# Altium PCB TYH-PD67W 2C1A 协议板.pcbdoc
Units mm, origin at the board's own origin, x right, y up, seen from the top; angles counter-clockwise.
Board outline 94.32 x 66.89 mm, 5 copper layers (Top Layer, Signal Layer 3, Signal Layer 1, Signal Layer 2, Bottom Layer), stack 0.941 mm thick; 46 components, 153 nets, 245 pads, 157 vias.
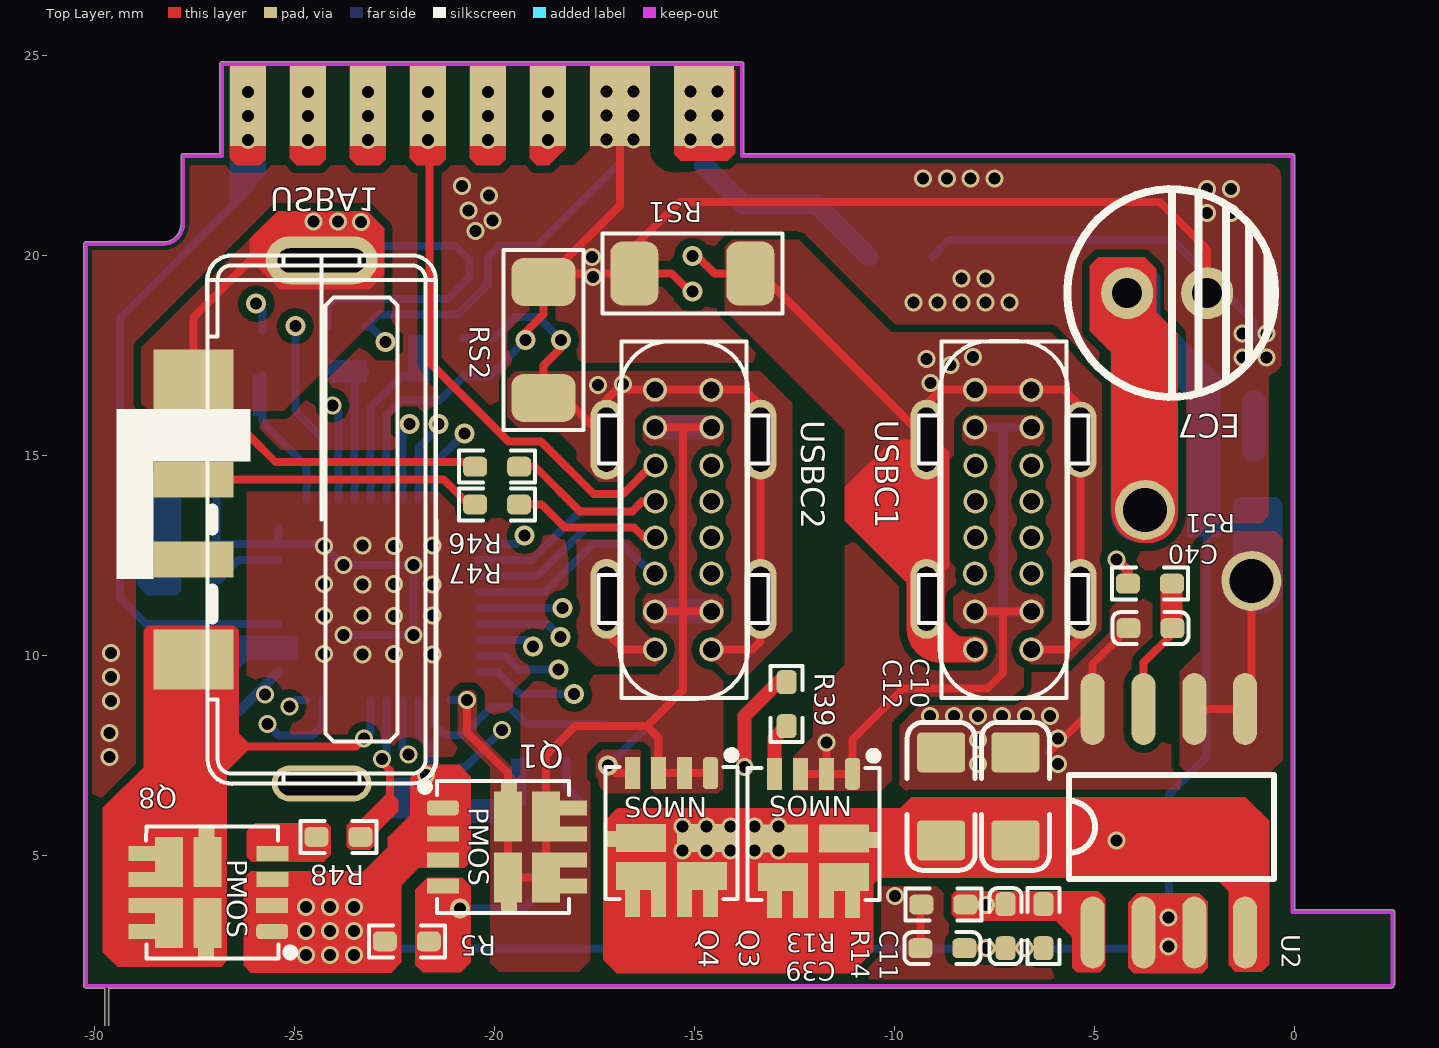
[diagram p0: Top Layer view]
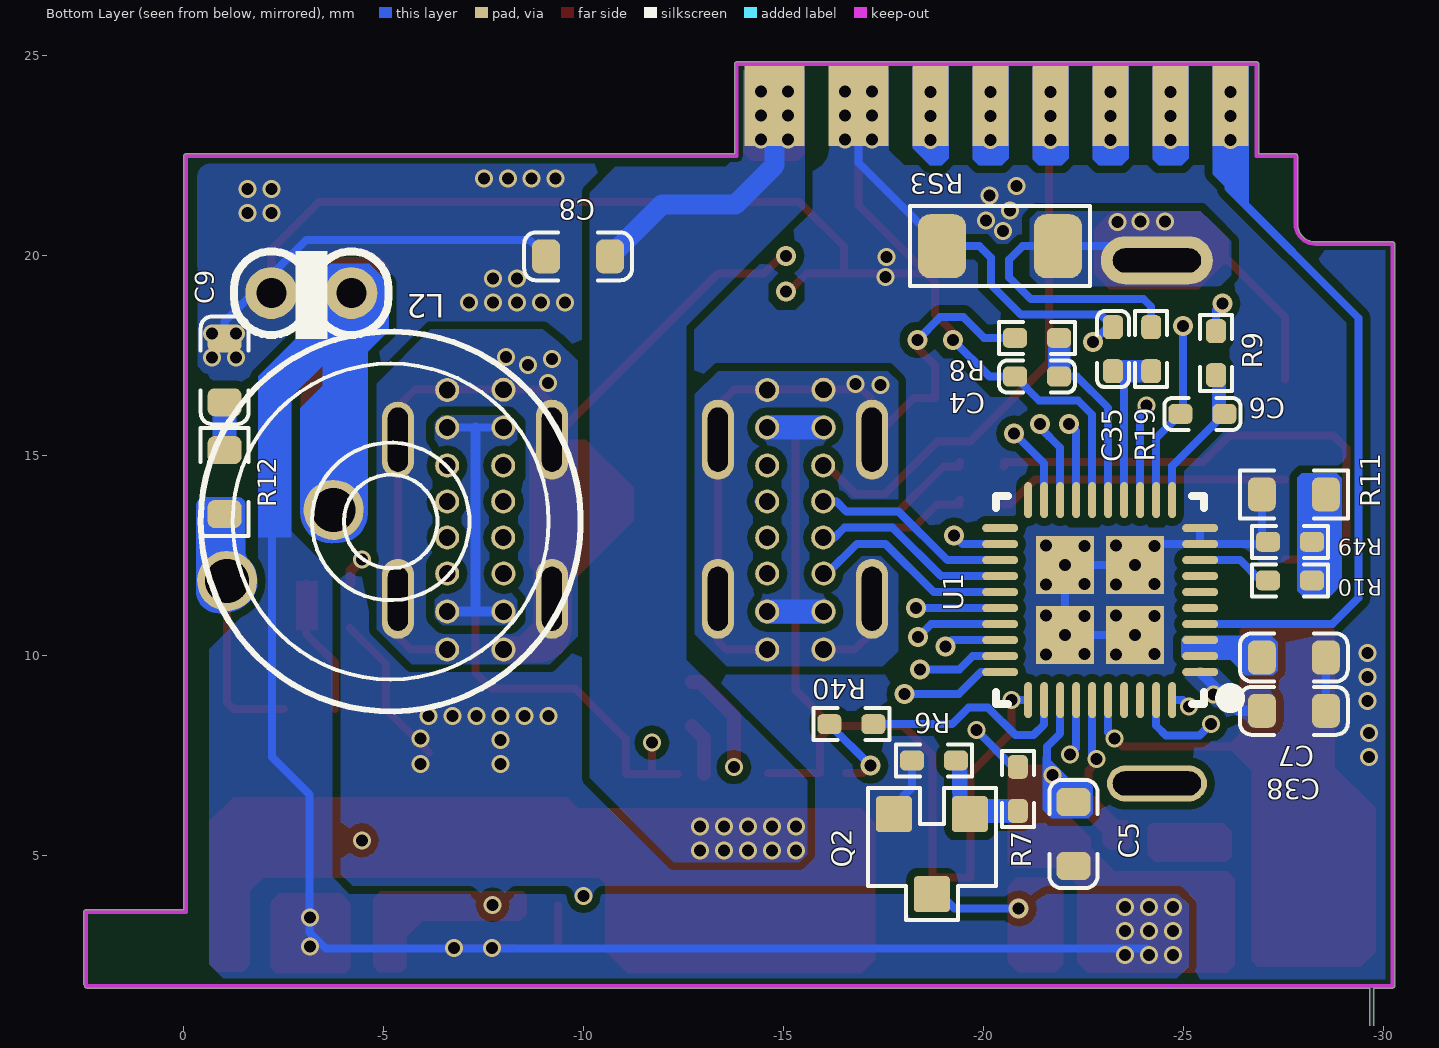
[diagram p1: Bottom Layer view, seen from below]
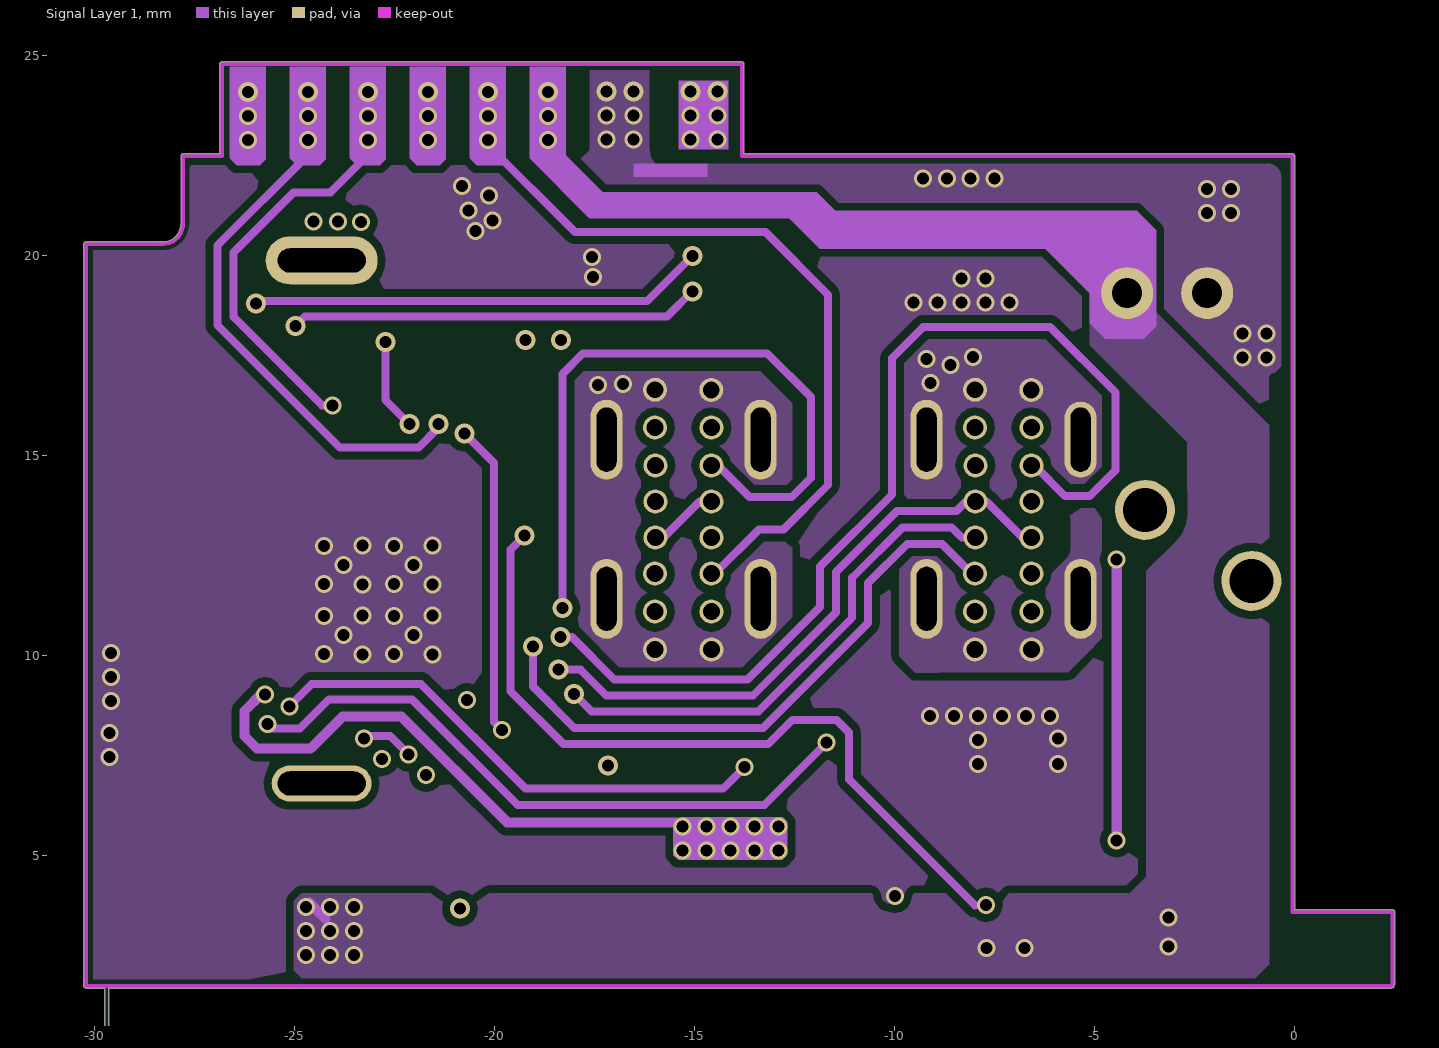
[diagram p2: Signal Layer 1]
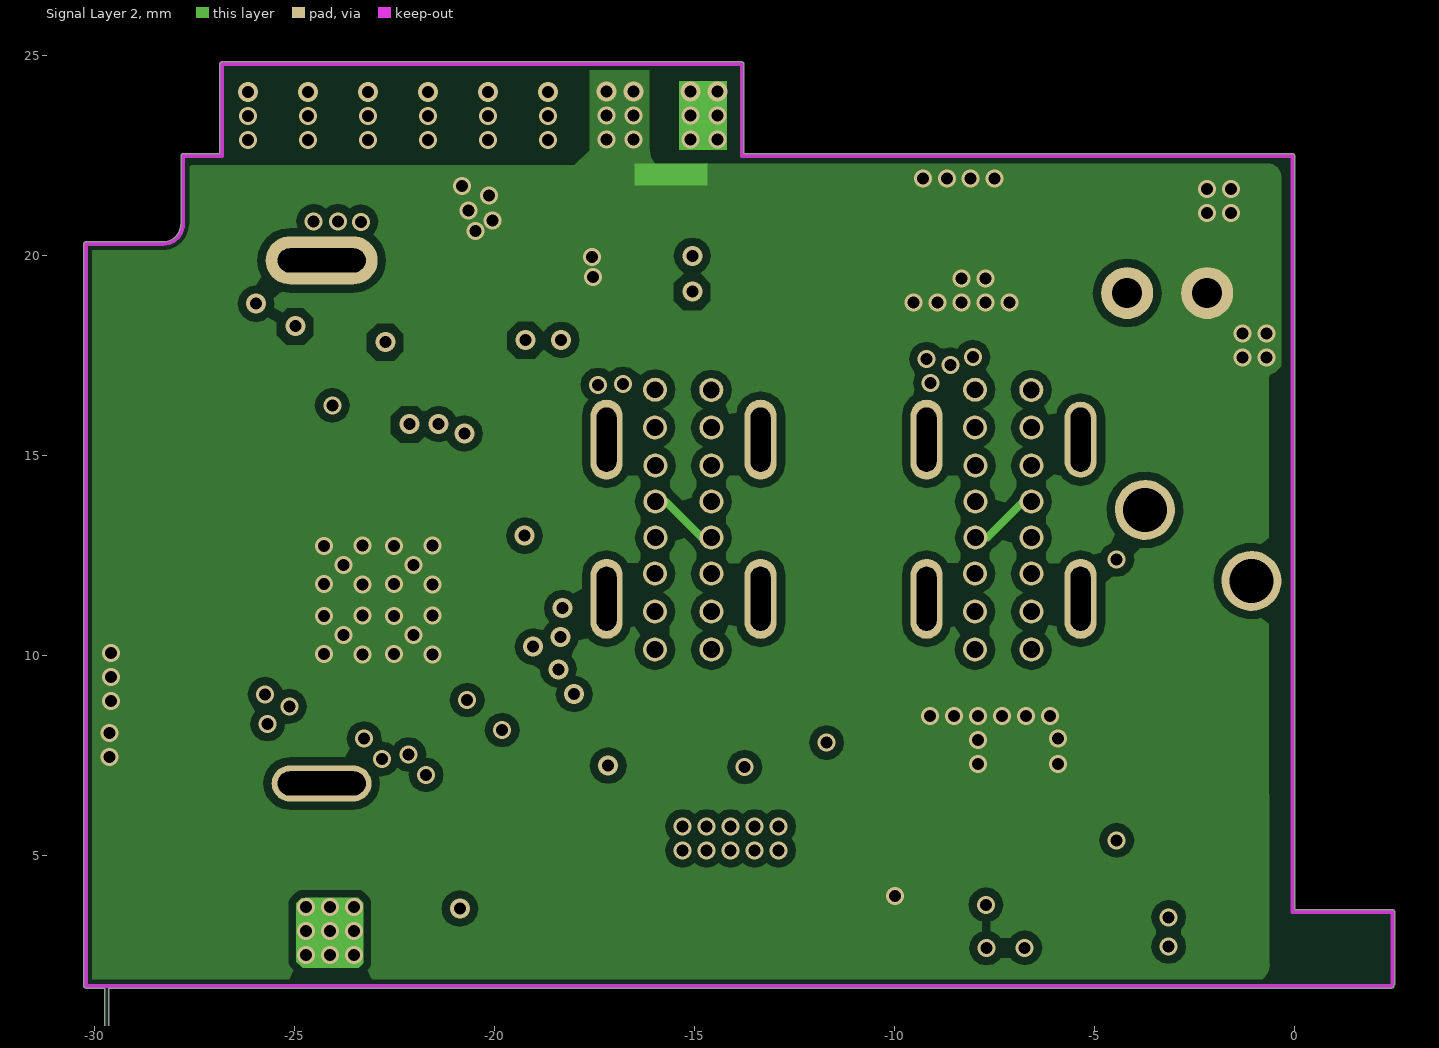
[diagram p3: Signal Layer 2]

## Layer stack, top to bottom
Top Solder: solder mask 0.0102, Solder Resist, Dk 3.5
Top Layer: signal copper 0.0356
Dielectric 1: core 0.254, FR-4, Dk 4.2
Signal Layer 3: signal copper 0.036
Dielectric 4: prepreg 0.127, Dk 4.2
Signal Layer 1: signal copper 0.036
Dielectric 2: core 0.254, Dk 4.2
Signal Layer 2: signal copper 0.036
Dielectric 3: prepreg 0.127, Dk 4.2
Bottom Layer: signal copper 0.0356
Bottom Solder: solder mask 0.0102, Solder Resist, Dk 3.5

## Board outline
-60.945,-41.225 -45.944,-41.225 ccw(c-45.944,-41.2) -45.919,-41.2 -45.919,-38.225 -43.445,-38.225 ccw(c-43.445,-38.2) -43.419,-38.2 -43.419,-37 ccw(c-43.445,-37) -43.445,-36.975 -45.919,-36.975 -45.919,-35.625 -43.445,-35.625 ccw(c-43.445,-35.6) -43.419,-35.6 -43.419,-34.4 ccw(c-43.445,-34.4) -43.445,-34.375 -45.919,-34.375 -45.919,-32.925 -43.445,-32.925 ccw(c-43.445,-32.9) -43.419,-32.9 -43.419,-27.85 -39.751,-27.85 -39.759,-40.693 ccw(c-39.709,-40.7) -39.709,-40.75 -29.759,-40.752 -29.76,-42.002 ccw(c-29.71,-42.002) -29.71,-42.052 0,-42.052 ccw(c0,-42.002) 0.05,-42.002 0.05,-37.55 2.5,-37.55 ccw(c2.5,-37.5) 2.55,-37.5 2.55,-32.55 5.163,-32.55 5.16,-37.409 ccw(c5.21,-37.409) 5.16,-37.409 ccw(c8.207,-37.409) 8.207,-40.456 ccw(c8.207,-40.406) 8.207,-40.456 ccw(c8.207,-40.406) 8.207,-40.456 25.296,-40.456 ccw(c25.296,-40.406) 25.308,-40.455 ccw(c25.296,-37.407) 28.344,-37.407 28.352,-4.393 ccw(c28.302,-4.393) 28.352,-4.393 ccw(c28.302,-4.393) 28.351,-4.381 ccw(c25.304,-4.393) 25.304,-1.346 8.229,-1.346 ccw(c8.229,-4.393) 5.181,-4.375 ccw(c5.228,-4.393) 5.178,-4.393 5.175,-9.653 ccw(c5.225,-9.653) 5.225,-9.703 6.674,-9.704 6.673,-10.703 5.225,-10.702 ccw(c5.225,-10.753) 5.174,-10.753 5.163,-32.45 0.05,-32.45 0.05,-9.32 2.5,-9.32 ccw(c2.5,-9.269) 2.55,-9.269 2.55,-2.769 ccw(c2.5,-2.769) 2.5,-2.719 0.05,-2.719 0.05,0 ccw(c0,0) 0,0.05 -29.65,0.05 -29.65,1.682 2.433,1.682 ccw(c2.433,1.733) 2.483,1.733 ccw(c2.433,1.733) 2.482,1.745 ccw(c2.45,1.784) 2.5,1.784 2.5,3.584 ccw(c2.45,3.584) 2.45,3.635 0,3.635 0,22.484 ccw(c-0.05,22.484) -0.014,22.52 ccw(c-0.05,22.484) -0.05,22.535 -13.768,22.535 -13.768,24.784 ccw(c-13.819,24.784) -13.819,24.835 -26.819,24.835 ccw(c-26.819,24.784) -26.869,24.784 -26.869,22.535 -27.789,22.535 ccw(c-27.789,22.484) -27.84,22.483 -27.84,20.784 cw(c-28.289,20.784) -28.289,20.335 cw(c-28.289,20.784) -28.289,20.335 cw(c-28.289,20.284) -28.289,20.335 -30.217,20.335 ccw(c-30.217,20.284) -30.268,20.284 -30.268,1.733 ccw(c-30.217,1.733) -30.217,1.682 -29.75,1.682 -29.75,-1.25 -31.7,-1.25 ccw(c-31.7,-1.3) -31.75,-1.3 -31.75,-26.75 -39.7,-26.75 ccw(c-39.7,-26.8) -39.75,-26.8 -39.751,-27.75 -43.445,-27.75 ccw(c-43.445,-27.8) -43.488,-27.775 -45.919,-27.775 -45.919,-24.3 ccw(c-45.945,-24.3) -45.945,-24.275 -65.945,-24.275 ccw(c-65.945,-24.3) -65.97,-24.3 -65.97,-36.2 ccw(c-60.945,-36.2)

## Design rules (kind name [scope] priority, off if disabled: settings)
Clearance Clearance_19 [InNet('NetC4_2') vs InNet('PGND')] p1: gap=0.4
Clearance Clearance_18 [InNet('NetR15_1') vs InNet('PGND')] p2: gap=1
Clearance Clearance_17 [InNet('NetN_1') vs InNet('NetBD1_1')] p3: gap=1.55
Clearance Clearance_16 [InNet('NetN_1') vs InNet('PGND')] p4: gap=1.5
Clearance Clearance_15 [InNet('VIN') vs InNet('PGND')] p5 off: gap=5.8
Clearance Clearance_14 [InNet('CS') vs InNet('Bais-L')] p6: gap=0.45
Clearance Clearance_13 [InNet('SW') vs InNet('CS')] p7: gap=1.5
Clearance Clearance_12 [InNet('NetR15_1') vs InNet('CS')] p8: gap=1
Clearance Clearance_11 [InNet('NetBD1_3') vs InNet('CS')] p9: gap=1.1
Clearance Clearance_10 [InNet('HV') vs InNet('CS')] p10: gap=1.1
Clearance Clearance_9 [InNet('NetL2_1') vs InNet('CS')] p11: gap=1.5
Clearance Clearance_8 [InNet('NetC1_2') vs InNet('PGND')] p12: gap=1.2
Clearance Clearance_7 [InNet('NetBD1_3') vs InNet('PGND')] p13: gap=1.2
Clearance Clearance_6 [InNet('NetC2_2') vs InNet('PGND')] p14: gap=1.3
Clearance Clearance_5 [InNet('Bais-L') vs InNet('PGND')] p15: gap=0.45
Clearance Clearance_4 [InNet('SW') vs InNet('PGND')] p16: gap=1.5
Clearance Clearance_3 [InNet('HV') vs InNet('PGND')] p17: gap=1.2
Clearance Clearance_2 [InNet('NetL2_1') vs InNet('PGND')] p18: gap=1.5
Clearance Clearance_1 [OnLayer('Keep-Out Layer')] p19: gap=0.1
Clearance [All] p20: gap=0.2
PlaneConnect [All] p1: planeconnectstyle=Direct reliefexpansion=0.508 reliefentries=4 reliefconductorwidth=0.3 reliefairgap=0.254
PolygonConnect [All] p1: connectstyle=Direct reliefconductorwidth=0.3 reliefentries=4 polygonreliefangle="90 Angle" airgapwidth=0.3
RoutingVias [All] p1: holewidth=0.711 width=1.27 viastyle="Through Hole" minholewidth=0.711 minwidth=1.27 maxholewidth=0.711 maxwidth=1.27
SolderMaskExpansion [All] p1: expansion=0.05
Width [All] p1: maxlimit=10 minlimit=0.1 preferedwidth=0.2
28 further rules are at their usual default settings.

## Components (designator, comment, footprint, x,y, rotation, side; value= is the part's Value field where it differs from the comment)
C4 "0.1uF" 0402C -22.279,16.568 r0 bottom
C5 "1uF" 0603CX -22.239,4.733 r90 bottom
C6 "0.1uF" 0402C -26.411,15.635 r0 bottom
C7 "1uF" 0603CX -26.947,9.945 r180 bottom
C8 "1uF" 0603CX -10.655,19.974 r0 bottom
C9 "100nF/50V/0603" 0603CX -1.018,17.925 r270 bottom
C10 "2.2nF/250V/0805" 0805C -6.977,6.474 r90 top
C11 "33nF/25V/0402" 0402C -6.826,4.177 r270 top (schematic designator C21)
C12 "100nF/50V/0603" 0805C -8.835,6.474 r90 top (schematic designator C9)
C35 "0.1uF" 0402C -22.826,16.704 r90 bottom
C38 "1uF" 0603CX -28.548,8.613 r0 bottom
C39 "33nF/25V/0402" 0402C -7.856,2.277 r180 top (schematic designator C21)
C40 "33nF/25V/0402" 0402C -4.555,11.078 r0 top (schematic designator C21)
EC7 "560uF/25V/6.3*16" EG-5*9L -4.184,19.056 r90 top (schematic designator EC6)
L2 "Comment" L-T31125W -5.169,13.346 r340 bottom
Q1 "PPM8PN03R10" DFN3*3 -18.718,5.974 r270 top
Q2 "2N7002KL SOT-23" SOT-23_R -18.699,5.028 r0 bottom (schematic designator Q8)
Q3 "PNM8PN30V50A" DFN3*3 -11.263,4.463 r180 top
Q4 "PNM8PN30V50A" DFN3*3 -14.814,4.479 r180 top
Q8 "PPM8PN03R10" DFN3*3 -28.135,3.309 r90 top
R5 "10K" 0402R#1 -22.746,2.848 r0 top (schematic designator R4)
R6 "10K" 0402R#1 -19.304,7.372 r0 bottom (schematic designator R4)
R7 "2K" 0402R#1 -20.847,7.21 r270 bottom (schematic designator R4)
R8 "100R" 0402R#1 -21.879,17.935 r0 bottom (schematic designator R4)
R9 "100R" 0402r -25.803,17.554 r270 bottom (schematic designator R4)
R10 "10K" 0402R#2 -27.654,11.872 r0 bottom (schematic designator R4)
R11 "100K" 0603Rx -26.947,14.024 r180 bottom (schematic designator R4)
R12 "10R/1206" 0603RX -1.018,15.132 r270 bottom (schematic designator R6)
R13 "1K/0402" 0402R#1 -8.231,3.767 r180 top (schematic designator R22)
R14 "1K/0402" 0402R#1 -6.281,2.677 r90 top (schematic designator R22)
R19 "100R" 0402R#1 -24.182,18.204 r270 bottom (schematic designator R4)
R39 "100R" 0402R#1 -12.698,8.229 r90 top (schematic designator R4)
R40 "100R" 0402R#1 -17.236,8.278 r0 bottom (schematic designator R4)
R46 "100R" 0402R#1 -19.386,14.714 r180 top (schematic designator R4)
R47 "100R" 0402R#1 -19.386,13.77 r180 top (schematic designator R4)
R48 "100R" 0402R#1 -24.454,5.462 r0 top (schematic designator R4)
R49 "10K" 0402R#2 -27.654,12.839 r0 bottom (schematic designator R4)
R51 "1K/0402" 0402R#1 -3.067,11.792 r180 top (schematic designator R22)
RS1 "5mR/1206/1%" 1206RA -17.257,20.543 r0 top (schematic designator RS2)
RS2 "5mR/1206" 1206RA -19.78,15.686 r90 top
RS3 "5mR/1206" 1206RA -18.2,21.227 r180 bottom (schematic designator RS2)
U1 "Comment" "QFN40 5*5" -22.907,11.38 r0 bottom
U2 "Comment" SO-8S -5.047,3.072 r0 top
USBA1 "Comment" "USB AF SMD-L" -24.325,13.396 r180 top locked
USBC1 "Comment" "USB C 16P 立式"#1 -7.266,13.387 r270 top locked
USBC2 "Comment" "USB C 16P 立式"#2 -15.267,13.387 r270 top locked

## Footprints (in the part's own frame and the unit in brackets; to place one, negate y for a bottom-side part, rotate by r counter-clockwise, add the part's x,y. Pads: shape width x height; smd on the part's side, far side on the other; paste and mask are expansions set on the pad)
0402C [mm]
  rrect50% 0.6x0.5 smd: 1(0.4,-0.4) 2(1.5,-0.4)
  silkscreen extent 0,-0.8 1.9,0, body extent 0.45,-0.66 1.45,-0.14, height 0.53
0402R#1 [mm]
  rrect50% 0.6x0.5 smd: 1(0,0) 2(1.1,0)
  silkscreen extent -0.4,-0.4 1.5,0.4, body extent 0.05,-0.25 1.05,0.25, height 0.3
0402R#2 [mm]
  rrect50% 0.6x0.5 smd: 1(-0.55,0) 2(0.55,0)
  silkscreen extent -0.95,-0.4 0.95,0.4, body extent -0.5,-0.25 0.5,0.25, height 0.3
0402r [mm]
  rrect50% 0.6x0.5 smd: 1(-0.55,0) 2(0.55,0)
  silkscreen extent -0.95,-0.4 0.95,0.4, body extent -0.5,-0.25 0.5,0.25, height 0.3
0603CX [mm]
  rrect50% 0.7x0.85 smd: 1(0,0) 2(1.6,0)
  silkscreen extent -0.55,-0.6 2.15,0.6, body extent 0,-0.41 1.6,0.41, height 0.81
0603Rx [mm]
  rrect50% 0.7x0.85 smd: 1(0,0) 2(1.6,0)
  silkscreen extent -0.55,-0.6 2.15,0.6, body extent 0.03,-0.42 1.58,0.43, height 0.45
0603RX [mm]
  rrect50% 0.7x0.85 smd: 1(0,0) 2(1.6,0)
  silkscreen extent -0.55,-0.6 2.15,0.6, body extent 0.03,-0.42 1.58,0.43, height 0.45
0805C [mm]
  rrect20% 1x1.2 smd: 1(-1.099,0.001) 2(1.101,0.001)
  silkscreen extent -1.85,-0.85 1.85,0.85, body extent -1,-0.61 1,0.61, height 0.51
1206RA [mm]
  rrect50% 1.2x1.6 smd mask+0.03: 1(3.65,-1) 2(0.75,-1)
  silkscreen extent -0.05,-2 4.45,0, body extent 0.6,-1.8 3.8,-0.2, height 0.55
DFN3*3 [mm]
  rrect50% 0.38x0.8 smd: 1(-0.212,-2.576)
  rect 0.38x0.8 smd: 2(0.438,-2.576) 3(1.088,-2.576) 4(1.738,-2.576)
  rect 0.38x1 smd: 5(1.738,0.524) 6(1.088,0.524) 7(0.438,0.524) 8(-0.212,0.524)
  rect 0.8x0.4 smd: 8(-0.458,-0.926) 8(2.034,-0.926)
  rect 1.25x0.7 smd: 8(0,-0.952) 8(0,0) 8(1.526,-0.952) 8(1.526,0)
  silkscreen extent -0.89,-3.18 2.41,0.57, body extent -0.89,-2.74 2.41,0.58, height 0.75
EG-5*9L [mm]
  round 1.3 hole 0.75: 1(0,0) 2(0,-2)
  silkscreen extent -2.6,-3.7 2.6,1.5, body extent -2.49,-3.49 2.51,1.51, height 9.02
L-T31125W [mm]
  round 1.5 hole 1.1: 1(1.241,-0.758) 2(4.35,0)
  silkscreen extent -4.75,-4.75 4.75,4.75, body extent -4.77,-4.77 4.77,4.77, height 4.86
"QFN40 5*5" [mm]
  oval 0.9x0.2 smd: 1(-2.5,1.8) 2(-2.5,1.4) 3(-2.5,1) 4(-2.5,0.6) 5(-2.5,0.2) 6(-2.5,-0.2) 7(-2.5,-0.6) 8(-2.5,-1) 9(-2.5,-1.4) 10(-2.5,-1.8) 21(2.5,-1.8) 22(2.5,-1.4) 23(2.5,-1) 24(2.5,-0.6) 25(2.5,-0.2) 26(2.5,0.2) 27(2.5,0.6) 28(2.5,1) 29(2.5,1.4) 30(2.5,1.8)
  oval 0.2x0.9 smd: 11(-1.8,-2.5) 12(-1.4,-2.5) 13(-1,-2.5) 14(-0.6,-2.5) 15(-0.2,-2.5) 16(0.2,-2.5) 17(0.6,-2.5) 18(1,-2.5) 19(1.4,-2.5) 20(1.8,-2.5) 31(1.8,2.5) 32(1.4,2.5) 33(1,2.5) 34(0.6,2.5) 35(0.2,2.5) 36(-0.2,2.5) 37(-0.6,2.5) 38(-1,2.5) 39(-1.4,2.5) 40(-1.8,2.5)
  rect 1.45x1.45 smd: 41(-0.875,-0.875) 41(-0.875,0.875) 41(0.875,-0.875) 41(0.875,0.875)
  silkscreen extent -3.37,-2.6 2.6,2.6, body extent -2.45,-2.45 2.45,2.45, height 0.8
SO-8S [mm]
  oval 0.6x1.8 smd: 1(0,0) 2(1.27,0) 3(2.54,0) 4(3.81,0) 5(3.81,5.588) 6(2.54,5.588) 7(1.27,5.588) 8(0,5.588)
  silkscreen extent -0.59,1.34 4.54,3.94, body extent -0.59,-0.26 4.41,5.74, height 1.9
SOT-23_R [mm]
  rrect20% 0.9x0.9 smd: 1(-0.95,-1) 2(0.95,-1) 3(0,1)
  silkscreen extent -1.6,-1.65 1.6,1.65, body extent -1.46,-1.44 1.44,1.36, height 1.2
"USB AF SMD-L" [mm]
  oval 2.5x0.9 hole 0.6 slot 2.2 at 0 deg: 0(0,6.6)
  oval 2.8x1.2 hole 0.6 slot 2.2 at 0 deg: 0(0,-6.475)
  rect 2x1.5 smd: +(3.198,3.5) -(3.198,-3.5)
  rect 2x0.9 smd: D+P(3.198,-1) D-M(3.198,1)
  silkscreen extent -2.85,-6.6 2.85,6.6, body extent -2.9,-6.61 3.42,6.61, height 10
"USB C 16P 立式"#1 [mm]
  round 0.6 hole 0.42: CC1(-1.355,0.685) CC2(1.345,-0.725) DM(-0.455,-0.715) DM(0.445,0.685) DP(-0.455,0.685) DP(0.445,-0.715) GND(-3.253,-0.723) GND(-3.247,0.684) GND(3.245,-0.725) GND(3.245,0.685) SBU1(1.345,0.685) SBU2(-1.355,-0.715) VBUS(-2.305,-0.725) VBUS(-2.305,0.685) VBUS(2.295,-0.725) VBUS(2.295,0.685)
  oval 2x0.8 hole 0.5 slot 1.6 at 0 deg: GND(-2.005,-1.935) GND(1.975,1.915) GND(1.975,-1.935)
  oval 1.9x0.8 hole 0.5 slot 1.6 at 0 deg: GND(-2.005,1.915)
  silkscreen extent -4.45,-2.13 4.46,2.12, body extent -4.47,-2.08 4.47,2.08, height 10
"USB C 16P 立式"#2 [mm]
  round 0.6 hole 0.42: CC1(-1.355,0.685) CC2(1.345,-0.725) DM(-0.455,-0.715) DM(0.445,0.685) DP(-0.455,0.685) DP(0.445,-0.715) GND(-3.253,-0.723) GND(-3.247,0.684) GND(3.245,-0.725) GND(3.245,0.685) SBU1(1.345,0.685) SBU2(-1.355,-0.715) VBUS(-2.305,-0.725) VBUS(-2.305,0.685) VBUS(2.295,-0.725) VBUS(2.295,0.685)
  oval 2x0.8 hole 0.5 slot 1.6 at 0 deg: GND(-2.005,-1.935) GND(-2.005,1.915) GND(1.975,1.915) GND(1.975,-1.935)
  silkscreen extent -4.45,-2.13 4.46,2.12, body extent -4.47,-2.08 4.47,2.08, height 10

## Part data
C9 C12: library part "Cap Semi", "Capacitor (Semiconductor SIM Model)"
C10: library part CAP
C11 C39 C40: library part Cap, "Capacitor"
EC7: library part CAPACITOR, "C?"
Q2: library part NMOS
R5 R6 R7 R8 R9 R10 R11 R19 R39 R40 R46 R47 R48 R49 RS1 RS2 RS3: library part RES, "Resistor"
R12 R13 R14 R51: library part Res1, "Resistor"

## Free pads (board coordinates)
  rect 1.5x2 smd far side: 0(-16.869,23.734) 1(-14.769,23.734)
  rect 1.5x2 smd: 0(-16.869,23.734) 1(-14.769,23.734)
  rect 0.9x2 smd far side: 2(-26.169,23.734) 2(-24.669,23.734) 2(-23.169,23.734) 2(-21.669,23.734) 2(-20.169,23.734) 2(-18.669,23.734)
  rect 0.9x2 smd: 2(-26.169,23.734) 2(-24.669,23.734) 2(-23.169,23.734) 2(-21.669,23.734) 2(-20.169,23.734) 2(-18.669,23.734)

## Via types
v1: diameter 0.45, hole 0.3, Top Layer to Bottom Layer, tented both sides, 129 vias
v2: diameter 0.5, hole 0.3, Top Layer to Bottom Layer, tented both sides, 28 vias

## Nets (pads, with @x,y where several pads share a name; then routed paths per layer and width w, separated by ;. In a path a pad name is that pad's centre, name@x,y a point inside that pad or via, vN(x,y) a via of type N, cw(c..) or ccw(c..) an arc to the next point about the centre after c; other vN are vias at no path point)
3.3V: 
A: 
A+: Q8.5 Q8.6 Q8.7 Q8.8 U1.34 U1.36 USBA1.+ | length 17.2
  Top Layer w0.2: -28.572,4.835 -28.572,3.309 -27.62,3.309 -27.524,3.405 -27.524,7.718 ; USBA1.+ -27.524,7.718 ; v1(-23.263,7.917) -23.462,7.718 -27.524,7.718
  Signal Layer 1 w0.2: v1(-23.263,7.917) -23.199,7.981 -22.609,7.981 v1(-22.148,7.52)
  Bottom Layer w0.2: v1(-23.263,7.917) -23.107,8.073 U1.36 ; U1.34 -22.307,7.679 v1(-22.148,7.52)
A-: R19.1 RS3.1 USBA1.0@-24.325,19.871 USBA1.- | length 14.1
  Top Layer w0.2: USBA1.- -27.524,18.46 -26.112,19.871 USBA1.0@-24.325,19.871
  Bottom Layer w0.2: USBA1.0@-24.325,19.871 -23.97,20.227 RS3.1 -20.965,20.227 -20.629,19.891 -20.629,19.449 -21.177,18.901 -23.995,18.901 -24.182,18.714 R19.1
  other v1: -24.522,20.85 -23.918,20.85 -23.346,20.837
Bais-L: 
BOOT0: 
CC1: 
CC2: 
CPA: C35.1 R19.2 U1.14 | length 4.3
  Bottom Layer w0.2: R19.2 C35.1 -23.507,16.823 U1.14
CS: 
D: 
D+: R47.2 USBA1.D+P | length 7.3
  Top Layer w0.2: USBA1.D+P -21.273,14.396 -20.647,13.77 R47.2
D-: R46.2 USBA1.D-M | length 13.2
  Top Layer w0.2: USBA1.D-M -28.652,12.396 -29.066,12.81 -29.066,15.164 -28.736,15.494 -26.138,15.494 -25.471,14.827 R46.2@-20.599,14.827 ; R46.2@-20.504,14.836 -20.513,14.827 R46.2@-20.599,14.827 ; R46.2 R46.2@-20.599,14.827
DM: 
DP: 
EM: 
EN: C40.2 R51.1 U2.7 | length 3.4
  Top Layer w0.2: U2.7 -3.777,9.817 -3.067,10.527 R51.1
EN_IC: 
FB: 
G-SR: 
GND-C: 
HV: 
ISET: 
KEY: 
KEY1: 
LEDA: 
M: 
N: 
NetBD1_1: 
NetBD1_3: 
NetBD2_1: 
NetC1_2: 
NetC2_2: 
NetC3_2: 
NetC4_1: 
NetC4_2: 
NetC6_1: 
NetC10_2: 
NetC21_1: 
NetC22_1: C9.2 R12.1 | length 1.2
  Bottom Layer w0.6: R12.1 C9.2
NetC24_1: 
NetC25_2: 
NetC26_2: 
NetC30_2: 
NetC31_2: 
NetC100_2: 
NetC101_1: 
NetC101_2: 
NetC112_1: 
NetD4_K: 
NetF1_1: 
NetF1_2: 
NetKEY1_1: 
NetL2_1: 
NetLF1_2: 
NetN_1: 
NetNTC2_1: 
NetQ1_3: 
NetQ3_4: 
NetR15_1: 
NetR25_2: 
NetR29_1: 
NetR31_2: 
NetR32_2: 
NetR41_2: 
NetR42_2: 
NetR134_1: 
NetRX1_2: 
NetRX3_2: 
NetU1_26: 
NetU1_27: 
NetU1_28: 
NetU1_29: 
NetU1_30: 
NetU1_32: 
NewNet1: U1.25 USBC2.CC2 | length 5.2
  Bottom Layer w0.2: U1.25 -18.746,11.58 -17.543,12.784 -16.822,12.784 -16.081,12.042 USBC2.CC2
NewNet2: Q1.5 Q1.6 Q1.7 Q1.8 Q4.1 Q4.2 Q4.3 U1.31 USBC2.VBUS | length 28.2
  Top Layer w0.2: v1(-20.685,8.88) -20.685,8.069 -19.67,7.055 -19.67,5.974 -19.67,4.448 -18.718,4.448 -18.718,5.974 -18.718,7.501 -17.993,8.226 -16.192,8.226 ; USBC2.VBUS@-15.991,11.092 -15.286,11.092 ; USBC2.VBUS@-15.991,15.692 USBC2.VBUS@-14.581,15.692 ; -15.286,15.674 -15.286,11.092 ; Q4.1 Q4.3 -15.902,7.936 -16.192,8.226 ; USBC2.VBUS@-14.581,11.092 -15.286,11.092 ; -16.192,8.226 -15.286,9.132 -15.286,11.092
  Bottom Layer w0.2: U1.31 v1(-20.685,8.88)
  Bottom Layer w0.6: USBC2.VBUS@-15.991,11.092 USBC2.VBUS@-14.581,11.092 ; USBC2.VBUS@-15.991,15.692 USBC2.VBUS@-14.581,15.692
NewNet3: R47.1 U1.24 USBC2.DP | length 10.8
  Top Layer w0.2: R47.1@-19.404,13.892 R47.1@-19.386,13.892 ; R47.1 -18.823,13.77 -18.244,13.191 -16.51,13.191 -16.261,12.942 USBC2.DP@-15.981,12.942
  Signal Layer 1 w0.2: USBC2.DP@-15.981,12.942 -15.775,12.942 -14.875,13.842 USBC2.DP@-14.581,13.842
  Bottom Layer w0.2: U1.24 -18.926,11.98 -17.716,13.191 -16.51,13.191 -16.261,12.942 USBC2.DP@-15.981,12.942 ; USBC2.DP@-14.581,13.842 USBC2.DP@-14.364,13.842
NewNet4: R46.1 U1.23 USBC2.DM | length 10.8
  Top Layer w0.2: R46.1@-19.404,14.836 R46.1@-19.386,14.836 ; R46.1 -18.984,14.714 -17.866,13.596 -16.558,13.596 -16.312,13.842 USBC2.DM@-15.981,13.842
  Signal Layer 2 w0.2: USBC2.DM@-15.981,13.842 -15.722,13.842 -14.822,12.942 USBC2.DM@-14.581,12.942
  Bottom Layer w0.2: U1.23 -19.084,12.38 -17.868,13.596 -16.558,13.596 -16.312,13.842 USBC2.DM@-15.981,13.842
NewNet5: U1.26 USBC2.CC1 | length 19.9
  Signal Layer 1 w0.2: v2(-18.304,11.18) -18.304,17.036 -17.789,17.551 -13.187,17.551 -12.092,16.455 -12.092,14.437 -12.573,13.956 -13.627,13.956 -14.413,14.742 USBC2.CC1
  Bottom Layer w0.2: U1.26 v2(-18.304,11.18)
NewNet6: Q4.4 R40.1 R40.2 U1.32 | length 7.6
  Top Layer w0.2: v2(-17.161,7.243) -16.973,7.055 Q4.4
  Bottom Layer w0.2: U1.32 -21.507,8.273 -21.239,8.005 -20.788,8.005 -20.102,8.691 -19.617,8.691 -19.205,8.278 R40.1 ; v2(-17.161,7.243) -16.136,8.269 R40.2
NewNet7: 
NewNet8: U1.27 USBC1.CC1 | length 28
  Signal Layer 1 w0.2: v2(-18.356,10.455) -18.067,10.455 -17.007,9.395 -13.681,9.395 -11.864,11.211 -11.864,12.217 -10.065,14.016 -10.065,17.426 -9.286,18.206 -6.112,18.206 -4.48,16.574 -4.48,14.626 -5.128,13.978 -5.739,13.978 -6.503,14.742 USBC1.CC1
  Bottom Layer w0.2: U1.27 -18.681,10.78 v2(-18.356,10.455)
NewNet9: U1.29 USBC1.DM | length 17.2
  Signal Layer 1 w0.2: v2@-18.48,9.604 v2@-18.465,9.589 ; v2(-18.408,9.646) -17.857,9.646 -17.201,8.99 -13.546,8.99 -11.465,11.072 -11.465,12.081 -9.938,13.608 -8.45,13.608 -8.215,13.842 -7.706,13.842 -6.806,12.942 USBC1.DM@-6.581,12.942
  Bottom Layer w0.2: U1.29 -19.719,9.98 -19.384,9.646 v2(-18.408,9.646)
NewNet10: U1.30 USBC1.DP | length 17.4
  Signal Layer 1 w0.2: v2(-18.011,9.032) -17.572,8.593 -13.408,8.593 -11.061,10.94 -11.061,11.94 -9.806,13.195 -8.574,13.195 -8.32,12.942 USBC1.DP@-7.981,12.942 ; USBC1.DP@-6.581,13.842 USBC1.DP@-6.372,13.842
  Signal Layer 2 w0.2: USBC1.DP@-7.981,12.942 -7.683,12.942 -6.783,13.842 USBC1.DP@-6.581,13.842
  Bottom Layer w0.2: U1.30 -19.921,9.58 -19.372,9.032 v2(-18.011,9.032)
NewNet11: U1.28 USBC1.CC2 | length 16.8
  Signal Layer 1 w0.2: v2(-19.039,10.214) -19.039,9.216 -18.007,8.185 -13.286,8.185 -10.662,10.81 -10.662,11.805 -9.683,12.783 -8.819,12.783 -8.078,12.042 USBC1.CC2
  Signal Layer 2 w0.2: USBC1.CC2@-8.056,12.042 USBC1.CC2
  Bottom Layer w0.2: U1.28 -19.205,10.38 v2(-19.039,10.214)
NewNet12: 
NewNet13: Q1.4 Q2.3 R5.2 | length 4.4
  Top Layer w0.2: R5.2 -21.294,3.2 -21.294,3.687 ; Q1.4 -21.294,3.687 ; v2(-20.869,3.669) -20.887,3.687 -21.294,3.687
  Bottom Layer w0.2: v2(-20.869,3.669) -19.267,3.669 Q2.3@-18.698,4.238
NewNet14: 
NewNet15: 
NewNet16: 
NewNet18: Q2.1 R6.1 R7.2 | length 2.5
  Bottom Layer w0.2: R7.2 -19.776,6.11 -19.648,6.238 -19.304,6.582 R6.1
NewNet22: 
NewNet23: 
NewNet24: R8.2 RS2.2 USBC2.GND | length 21.1
  Top Layer w0.2: v2(-18.337,17.886) -18.337,17.684 -18.78,17.242 RS2.2 -18.246,16.436 -17.201,15.392 -17.201,16.394 -16.956,16.64 -15.99,16.64 -13.748,16.64 -13.351,16.243 -13.351,15.392 -13.351,10.349 -13.558,10.142 USBC2.GND@-14.581,10.142 ; USBC2.GND@-17.201,11.412 -17.201,10.573 -16.77,10.142 USBC2.GND@-15.991,10.142
  Bottom Layer w0.2: R8.2 -20.006,17.935 -19.488,18.453 -18.905,18.453 v2(-18.337,17.886)
  other v1: -17.417,16.761 -16.79,16.785
NewNet25: C4.1 R8.1 U1.15 | length 4.8
  Bottom Layer w0.2: U1.15 -23.107,16.188 -22.322,16.972 -21.879,16.972 R8.1
NewNet28: Q3.4 R39.1 R39.2 U1.40 | length 17.4
  Top Layer w0.35: v1(-13.748,7.207) -13.748,8.485 -12.904,9.329 R39.2 ; Q3.4 -13.001,7.926 R39.1
  Signal Layer 1 w0.2: v1(-25.131,8.726) -24.574,9.282 -21.845,9.282 -19.231,6.669 -14.286,6.669 v1(-13.748,7.207)
  Bottom Layer w0.2: v1(-25.131,8.726) -24.976,8.88 U1.40
NewNet32: R10.1 R11.2 R49.1 | length 2.3
  Bottom Layer w0.2: R11.2 -28.204,13.682 R10.1
NewNet33: pad.2@-26.169,23.734 U1.4 | length 17.9
  Bottom Layer w0.2: pad.2@-26.169,23.734 -26.169,21.731 -26.118,21.68 -29.36,18.438 -29.36,11.43 -28.71,10.78 U1.4
  other v1: -26.166,22.883 -26.166,23.482
  other v2: -26.166,24.081
NewNet34: C7.1 U1.2 U1.3 | length 1.9
  Bottom Layer w0.2: C7.1@-26.911,9.98 U1.2 U1.3
NewNet36: C6.1 R9.2 U1.11 | length 3.6
  Bottom Layer w0.2: R9.2 -25.803,15.828 -24.707,14.731 U1.11
NewNet38: R7.1 U1.19 | length 11.2
  Signal Layer 1 w0.2: v2(-20.756,15.545) -20.018,14.808 -20.018,8.338 v1(-19.81,8.13)
  Bottom Layer w0.2: U1.19 -21.507,14.795 v2(-20.756,15.545) ; R7.1 -20.729,7.21 v1(-19.81,8.13)
NewNet40: 
NewNet41: Q3.1 Q3.2 Q3.3 U1.39 USBC1.VBUS | length 36
  Top Layer w0.2: Q3.3 Q3.1 -11.051,7.901 -9.787,9.166 -7.684,9.166 -7.286,9.564 -7.286,11.092 ; Q3.2 v1(-11.701,7.815) ; USBC1.VBUS@-7.991,11.092 -7.286,11.092 ; USBC1.VBUS@-6.581,11.092 -7.286,11.092
  Signal Layer 1 w0.2: v1(-25.676,8.282) -25.568,8.174 -24.868,8.174 -24.146,8.896 -22.063,8.896 -19.43,6.262 -13.255,6.262 v1(-11.701,7.815)
  Bottom Layer w0.2: v1(-25.676,8.282) -25.391,7.997 -24.55,7.997 -24.307,8.24 U1.39 ; USBC1.VBUS@-7.991,15.692 -7.286,15.692 USBC1.VBUS@-6.581,15.692
  Bottom Layer w0.25: USBC1.VBUS@-7.991,11.092 -7.286,11.092 ; -7.286,15.692 -7.286,11.092 ; USBC1.VBUS@-6.581,11.092 -7.286,11.092
NewNet42: R9.1 RS1.1 USBC1.GND | length 34.3
  Top Layer w0.2: v2(-15.057,19.985) -14.947,19.985 -14.504,19.543 RS1.1 -13.353,19.543 -9.201,15.392 -9.201,16.279 -8.841,16.64 -7.99,16.64 -5.771,16.64 -5.351,16.219 -5.351,15.392 -5.351,10.464 -5.673,10.142 USBC1.GND@-6.581,10.142 ; USBC1.GND@-9.201,11.412 -9.201,10.662 -8.681,10.142 USBC1.GND@-7.991,10.142
  Signal Layer 1 w0.2: v2(-25.964,18.79) -25.897,18.857 -16.185,18.857 v2(-15.057,19.985)
  Bottom Layer w0.2: v2(-25.964,18.79) -25.803,18.629 R9.1
  other v1: -9.099,16.806 -8.603,17.263 -9.202,17.404 -8.046,17.454
OPTO: 
OTP: R10.2 U1.8 | length 1.9
  Bottom Layer w0.2: R10.2 -26.916,11.872 -26.408,12.38 U1.8
PA2: 
PA4: 
PA5: 
PA6: 
PA7: 
PA8: 
PA9: 
PB0: 
PB1: 
PF0: 
PF1: 
PF3: 
PGND: 
RS: 
RST: 
SCL: pad.2@-24.669,23.734 U1.18 | length 14.8
  Signal Layer 1 w0.2: v1(-24.666,22.883) -24.666,22.509 -26.933,20.242 -26.933,18.257 -23.865,15.189 -21.905,15.189 -21.4,15.695 v2(-21.4,15.782)
  Bottom Layer w0.2: U1.18 -21.907,15.189 -21.4,15.696 v2(-21.4,15.782)
  other v1: -24.666,23.482
  other v2: -24.666,24.081
SCL1: 
SDA: pad.2@-23.169,23.734 U1.13 | length 12.2
  Signal Layer 1 w0.2: v1(-24.059,16.25) -24.317,16.25 -26.529,18.462 -26.529,20.072 -25.031,21.57 -24.107,21.57 -23.166,22.511 v1(-23.166,22.883)
  Bottom Layer w0.2: v1(-24.059,16.25) -23.907,16.098 U1.13
  other v1: -23.166,23.482
  other v2: -23.166,24.081
SDA1: 
SET: 
SGND: C4.2 C5.1 C6.2 C7.2 C8.2 C9.1 C10.2 C12.2 C35.2 C38.1 C39.2 C40.1 EC7.2 pad.0 Q2.2 R6.2 R11.1 R13.2 R49.2 RS1.2 RS2.1 RS3.2 U1.9 U1.10 U1.12 U1.16 U1.17 U1.41 U2.8 | length 91.2
  Top Layer w0.2: v2(-19.222,17.886) -19.222,18.084 -18.78,18.526 RS2.1 RS2.1@-18.572,19.543 ; pad.0@-16.869,23.734 -16.869,21.247 RS2.1@-18.572,19.543 ; v2(-15.057,19.101) -15.131,19.101 -15.573,19.543 RS1.2 ; C39.2 R13.2@-9.356,3.742 ; -6.132,7.575 U2.8 -5.047,9.787 C40.1 ; EC7.2 -2.184,20.144 -3.368,21.328 -15.393,21.328 -16.507,20.214 RS1.2 ; RS2.1@-18.572,19.543 RS1.2
  Signal Layer 1 w0.2: v2(-24.982,18.23) -24.746,18.467 -15.691,18.467 v2(-15.057,19.101) ; v2(-22.73,17.838) -22.73,16.377 v2(-22.132,15.779)
  Bottom Layer w0.2: C38.1@-28.547,8.614 C7.2 ; R11.1 -26.947,12.879 -27.046,12.78 U1.9 ; U1.10 U1.9 ; v2(-24.982,18.23) -24.982,16.106 C6.2 -24.307,15.43 U1.12 ; v1(-23.782,10.505) v1(-22.032,10.505) v1(-22.032,12.255) v1(-23.782,12.255) -24.307,12.78 U1.9 ; v2(-22.73,17.838) -23.096,18.204 C35.2 -22.912,18.518 -20.923,18.518 -20.171,19.27 -20.171,19.948 -19.892,20.227 RS3.2 -16.869,22.308 pad.0@-16.869,23.734 ; U1.16 -22.707,16.016 -22.358,16.365 -21.382,16.365 C4.2 -20.14,16.968 v2(-19.222,17.886) ; U1.17 -22.307,15.605 v2(-22.132,15.779) ; R6.2 -18.204,6.693 Q2.2@-17.748,6.238 ; C8.2 -8.646,20.383 -3.06,20.383 -1.018,18.341 C9.1
  other v1: -9.993,3.986 -7.916,7.277 -5.909,7.277 -29.627,7.463 -7.916,7.877 -5.909,7.915 -29.627,8.063 -9.116,8.477 -8.516,8.477 -7.916,8.477 -7.316,8.477 -6.716,8.477 -6.116,8.477 -29.585,8.854 -29.585,9.454 -24.263,10.033 -23.306,10.02 -22.513,10.033 -21.556,10.02 -29.585,10.054 -24.263,10.978 -23.306,10.991 -22.513,10.978 -21.556,10.991 -24.263,11.783 -23.306,11.77 -22.513,11.783 -21.556,11.77 -24.263,12.728 -22.513,12.728 -23.306,12.741 -21.556,12.741 -1.308,17.45 -0.708,17.45 -1.308,18.05 -0.708,18.05 -9.528,18.822 -8.928,18.822 -8.328,18.822 -7.728,18.822 -7.128,18.822 -8.328,19.422 -7.728,19.422 -17.536,19.454 -17.562,19.953 -20.481,20.603 -20.048,20.868 -2.192,21.058 -1.592,21.058 -20.649,21.123 -20.141,21.496 -2.192,21.658 -1.592,21.658 -20.817,21.727 -9.288,21.924 -8.688,21.924 -8.099,21.924 -7.499,21.924 -17.207,22.892 -16.531,22.892 -17.207,23.49 -16.531,23.49
  other v2: -17.207,24.089 -16.531,24.089
SRCG_A: Q8.4 R48.1 R48.2 U1.35 | length 5.1
  Top Layer w0.2: Q8.4 -24.869,5.047 R48.1 ; R48.2 -22.611,6.205 -22.611,7.114 -22.81,7.312 v1(-22.81,7.409)
  Bottom Layer w0.2: v1(-22.81,7.409) -22.707,7.512 U1.35
SW: 
SW-SR: L2.2 R12.2 U2.5 U2.6 | length 6.1
  Top Layer w0.2: U2.6 U2.5 -1.081,8.816 L2.2
  Bottom Layer w0.2: L2.2@-1.018,11.922 R12.2
SWCLK: 
SWCLK1: 
SWCLK2: pad.2@-21.669,23.734 USBC2.SBU2 | length 12.9
  Top Layer w0.2: pad.2@-21.626,22.883 -21.626,17.318 -19.655,15.346 -18.837,15.346 -17.522,14.032 -16.786,14.032 -16.076,14.742 USBC2.SBU2
  other v1: -21.666,22.883 -21.666,23.482
  other v2: -21.666,24.081
SWDIO: 
SWDIO1: 
SWDIO2: pad.2@-20.169,23.734 USBC2.SBU1 | length 18.8
  Signal Layer 1 w0.2: v1(-20.166,22.883) -20.166,22.752 -17.994,20.58 -13.231,20.58 -11.661,19.01 -11.661,14.262 -12.775,13.148 -13.392,13.148 -14.498,12.042 USBC2.SBU1
  other v1: -20.166,23.482
  other v2: -20.166,24.081
SWRST: 
TXD: 
U2-2: 
V3V3: 
VBUS: 
VC: 
VDD: 
VDD1: 
VDS: 
VFB: 
VFB1: C11.1 R13.1 R14.2 U1.22 U2.1 | length 23.7
  Top Layer w0.3: R13.1@-8.231,3.755 -5.731,3.755 U2.1
  Signal Layer 1 w0.2: v2(-19.252,12.989) -19.602,12.639 -19.602,9.103 -18.28,7.781 -13.159,7.781 -12.558,8.382 -11.456,8.382 -11.14,8.067 -11.14,6.899 -7.992,3.75
  Bottom Layer w0.2: U1.22 -19.461,12.78 v2(-19.252,12.989)
  other v1: -7.717,3.762
VIN: C8.1 C10.1 C12.1 C38.2 pad.1 Q3.5 Q3.6 Q3.7 Q3.8 Q4.5 Q4.6 Q4.7 Q4.8 R51.2 U1.1 U2.4 | length 51.3
  Top Layer w0.254: Q4.8@-16.34,5.431 -16.34,4.479 -14.814,4.479 Q4.8@-14.814,5.431 ; v1(-14.701,5.721) Q3.8@-12.692,5.721 ; Q3.8@-12.789,5.415 -12.789,4.463 -11.263,4.463 Q3.8@-11.263,5.375 ; Q3.8@-11.223,5.375 C10.1 -2.128,5.375 -1.237,4.484 U2.4 ; v1(-4.447,12.392) -4.167,12.111 R51.2
  Signal Layer 1 w0.254: v1(-25.739,9.026) -25.831,9.026 -26.251,8.606 -26.251,7.984 -25.939,7.672 -24.6,7.672 -23.8,8.471 -22.335,8.471 -19.686,5.823 -15.206,5.823 -14.814,5.431 ; v1(-4.447,5.375) v1(-4.447,12.392)
  Bottom Layer w0.254: C38.2 -26.374,8.613 U1.1
  Bottom Layer w0.5: pad.1@-14.769,23.734 -14.769,22.254 -13.78,21.265 -11.947,21.265 C8.1
  other v1: -15.301,5.121 -14.701,5.121 -14.101,5.121 -13.501,5.121 -12.901,5.121 -15.301,5.721 -14.101,5.721 -13.501,5.721 -12.901,5.721 -15.107,22.892 -14.431,22.892 -15.107,23.49 -14.431,23.49
  other v2: -15.107,24.089 -14.431,24.089
VMS: 
VOUT1: C5.2 C11.2 C39.1 EC7.1 L2.1 pad.2@-18.669,23.734 Q1.1 Q1.2 Q1.3 Q8.1 Q8.2 Q8.3 R5.1 R14.1 U1.33 U2.2 U2.3 | length 61.6
  Top Layer w0.2: -22.063,5.701 -21.578,6.186 Q1.1 ; C39.1 v1@-6.748,2.677
  Top Layer w0.25: -25.996,4.397 -25.996,3.097 -25.747,2.848 R5.1 -22.746,4.503 -22.363,4.886 Q1.3 Q1.1 ; U2.2 U2.3
  Signal Layer 1 w0.254: v1@-24.626,3.812 -24.235,3.421 ; v1(-18.666,22.883) -18.666,22.452 -17.443,21.229
  Bottom Layer w0.2: v1@-24.074,2.675 -3.539,2.675 -3.142,3.072 -3.142,6.517 -2.199,7.459 -2.199,17.071 EC7.1 -4.184,14.076 L2.1 ; U1.33 -21.907,8.043 -21.578,7.715 -21.578,7.141 v1(-21.711,7.008)
  other v1: -24.721,2.51 -24.121,2.51 -23.521,2.51 -7.7,2.679 -6.748,2.687 -3.149,2.717 -24.721,3.11 -24.121,3.11 -23.521,3.11 -3.149,3.45 -24.721,3.71 -24.121,3.71 -23.521,3.71 -18.666,23.482
  other v2: -18.666,24.081
VXO: 
XGND: 
pads on no net: U1.5 U1.6 U1.7 U1.20 U1.21 U1.37 U1.38 USBA1.0@-24.325,6.796 USBC1.SBU1 USBC1.SBU2

## Polygon pours and split planes (outlines as drawn)
NewNet2 on Bottom Layer "Bottom Layer-No Net" (solid, remove dead copper, pour order 111): -15.991,16.202 -14.425,16.202 -14.11,15.887 -14.11,10.842 -14.221,10.731 -16.297,10.731 -16.462,10.897 -16.462,15.887 -16.187,16.163
SGND on Bottom Layer "Bottom Layer-No Net" (solid, remove dead copper, pour order 109): -17.624,24.732 -17.624,22.631 -18.005,22.25 -18.797,22.25 -27.589,22.25 -27.789,22.049 -27.789,21.614 cw(c-28.289,21.614) -28.289,21.114 -30.2,21.114 -30.2,1.784 -1.125,1.784 ccw(c-1.125,2.275) -0.635,2.275 -0.635,16.933 cw(c-0.509,16.933) -0.509,17.059 ccw(c-0.509,17.228) -0.34,17.228 -0.34,17.44 -0.34,21.961 ccw(c-0.67,21.961) -0.67,22.291 -14.68,22.291 ccw(c-14.68,22.165) -14.769,22.254 cw(c-15.191,22.676) -15.191,22.079 -15.349,22.079 -15.51,22.079 cw(c-15.51,22.697) -16.128,22.697 -16.128,24.729 -17.237,24.729
NewNet24 on Bottom Layer "Bottom Layer-No Net" (solid, remove dead copper, pour order 110): -13.359,17.107 -17.599,17.107 -17.854,16.852 -17.854,10.102 -17.474,9.723 -13.575,9.723 -12.919,10.379 -12.777,10.521 -12.777,10.731 -12.777,16.525 -13.359,17.107
VOUT1 on Bottom Layer "Bottom Layer-No Net" (solid, remove dead copper, pour order 79): -1.856,11.374 -0.635,10.153 -0.635,2.275 -0.986,1.924 -24.816,1.924 -25.12,2.229 -25.12,3.761 -24.849,4.032 -4.139,4.032 -3.712,4.458 -3.712,12.07 -2.684,13.098 -2.684,16.46 -2.17,16.974 -1.856,16.974
VIN on Bottom Layer "Bottom Layer-No Net" (solid, remove dead copper, pour order 105): -15.515,24.736 -15.515,21.184 -12.558,18.227 -12.558,9.89 -15.577,6.87 -15.577,5.023 -15.382,4.827 -12.251,4.827 -10.144,6.934 -10.144,21.57 -10.788,22.214 -13.548,22.214 -13.819,22.484 -13.819,24.784 -15.499,24.784 -15.518,24.765
NewNet41 on Bottom Layer "Bottom Layer-No Net" (solid, remove dead copper, pour order 83): -8.131,16.007 -6.449,16.007 -6.267,15.826 -6.267,10.946 -6.426,10.787 -6.467,10.746 -6.691,10.746 -8.18,10.746 -8.329,10.895 -8.329,15.81 -8.131,16.007
NewNet42 on Bottom Layer "Bottom Layer-No Net" (solid, remove dead copper, pour order 84): -8.97,18.15 -6.176,18.15 -4.821,16.795 -4.821,10.654 -5.701,9.774 -9.144,9.774 -9.511,10.141 -9.887,10.517 -9.887,10.897 -9.887,17.317 -9.346,17.857
A- on Bottom Layer "Bottom Layer-No Net" (solid, remove dead copper, pour order 90): -25.67,20.863 -25.426,21.107 -23.144,21.107 -21.334,21.107 -21.147,20.92 -21.147,19.489 -21.412,19.224 -25.907,19.224 -26.183,19.499 -26.183,20.35 -25.67,20.863
VIN on Bottom Layer "Bottom Layer-No Net" (solid, remove dead copper, pour order 96): -27.278,8.153 -26.302,8.153 -25.487,8.968 -24.956,9.498 -24.956,9.597 -25.041,9.681 -25.098,9.681 -25.838,9.681 -26.09,9.429 -26.38,9.14 -26.874,9.14 -27.165,9.14 -27.376,8.928 -27.376,8.258 -27.295,8.177
SGND on Top Layer "Bottom Layer-No Net" (solid, remove dead copper, pour order 108): -17.624,24.732 -17.624,22.631 -18.005,22.25 -18.797,22.25 -27.589,22.25 -27.789,22.049 -27.789,21.614 cw(c-28.289,21.614) -28.289,21.114 -30.2,21.114 -30.2,1.784 -1.125,1.784 ccw(c-1.125,2.275) -0.635,2.275 -0.635,16.933 cw(c-0.509,16.933) -0.509,17.059 ccw(c-0.509,17.228) -0.34,17.228 -0.34,17.44 -0.34,21.961 ccw(c-0.67,21.961) -0.67,22.291 -14.68,22.291 ccw(c-14.68,22.165) -14.769,22.254 cw(c-15.191,22.676) -15.191,22.079 -15.349,22.079 -15.51,22.079 cw(c-15.51,22.697) -16.128,22.697 -16.128,24.729 -17.237,24.729
NewNet41 on Top Layer "Bottom Layer-No Net" (solid, remove dead copper, pour order 64): -12.465,6.615 -10.788,6.615 -10.331,6.615 -10.074,6.873 -10.074,8.329 -9.598,8.805 -9.445,8.957 -8.168,8.957 -7.033,8.957 -6.772,9.218 -6.772,9.831 -6.836,9.896 -6.874,9.933 -6.874,10.14 -6.874,10.34 -6.335,10.878 -6.264,10.95 -6.264,11.065 -6.264,15.822 -6.409,15.967 -6.449,16.007 -6.554,16.007 -8.131,16.007 -8.312,15.826 -8.312,14.911 -9.08,14.144 -9.836,14.144 -11.241,12.738 -11.241,9.757 -12.029,8.97 -12.029,7.975 -12.539,7.465 -12.539,6.637 -12.522,6.62
NewNet2 on Top Layer "Bottom Layer-No Net" (solid, remove dead copper, pour order 69): -19.884,2.092 -17.894,2.092 -17.604,2.382 -17.604,6.819 -17.703,6.917 -17.703,7.533 -17.393,7.843 -16.268,7.843 -16.097,7.672 -16.097,6.649 -16,6.552 -14.416,6.552 -14.286,6.682 -14.286,9.35 -14.885,9.949 -14.885,10.331 -14.273,10.943 -14.273,15.814 -14.456,15.997 -16.12,15.997 -16.298,15.819 -16.298,10.905 -15.703,10.31 -15.703,9.726 -15.91,9.519 -18.835,9.519 -19.347,9.008 -19.347,7.025 -19.452,6.92 -19.567,7.036 -19.567,7.2 -20.442,8.075 -20.442,9.011 -20.552,9.12 -20.789,9.12 -20.92,8.989 -20.92,8.01 -20.11,7.199 -20.11,2.318
A- on Top Layer "Bottom Layer-No Net" (solid, remove dead copper, pour order 70): -28.564,16.111 -25.266,16.111 -24.494,16.883 -22.754,18.623 -22.754,19.447 -22.754,20.409 -23.208,20.863 -25.67,20.863 -28.238,18.295 -28.829,17.704 -28.829,17.131 -28.829,16.297 -28.692,16.16
NewNet24 on Top Layer "Bottom Layer-No Net" (solid, remove dead copper, pour order 72): -19.476,17.107 -13.359,17.107 -12.558,16.306 -12.558,10.618 -13.656,9.519 -17.27,9.519 -17.949,10.198 -17.949,15.128 -18.4,15.579 -19.385,15.579 -19.687,15.882 -19.687,16.896
NewNet6 on Top Layer "Bottom Layer-No Net" (solid, remove dead copper, pour order 75): -17.393,7.843 -16.584,7.843 -16.352,7.611 -16.352,6.615 -16.402,6.565 -16.416,6.551 -16.438,6.551 -17.212,6.551 -17.38,6.719 -17.466,6.805 -17.466,7.082 -17.466,7.769 -17.393,7.843
SW-SR on Top Layer "Bottom Layer-No Net" (solid, remove dead copper, pour order 86): -2.712,7.071 -0.611,7.071 -0.3,7.382 -0.3,12.933 -0.47,13.103 -1.987,13.103 -2.363,12.728 -2.363,10.112 -2.877,9.598 -2.877,7.236
NewNet42 on Top Layer "Bottom Layer-No Net" (solid, remove dead copper, pour order 68): -14.063,20.392 -12.396,20.392 -10.127,18.123 -10.02,18.078 -6.104,18.078 -4.821,16.795 -4.821,10.654 -5.701,9.774 -9.34,9.774 -11.241,11.675 -11.241,15.622 -14.249,18.629 -14.249,20.207
SGND on Signal Layer 1 "Bottom Layer-No Net" (solid, remove dead copper, pour order 107): -17.624,24.732 -17.624,22.631 -18.005,22.25 -18.797,22.25 -27.589,22.25 -27.789,22.049 -27.789,21.614 cw(c-28.289,21.614) -28.289,21.114 -30.2,21.114 -30.2,1.784 -1.125,1.784 ccw(c-1.125,2.275) -0.635,2.275 -0.635,16.933 cw(c-0.509,16.933) -0.509,17.059 ccw(c-0.509,17.228) -0.34,17.228 -0.34,17.44 -0.34,21.961 ccw(c-0.67,21.961) -0.67,22.291 -14.68,22.291 ccw(c-14.68,22.165) -14.769,22.254 cw(c-15.191,22.676) -15.191,22.079 -15.349,22.079 -15.51,22.079 cw(c-15.51,22.697) -16.128,22.697 -16.128,24.729 -17.237,24.729
NewNet24 on Signal Layer 1 "Bottom Layer-No Net" (solid, remove dead copper, pour order 76): -17.937,11.441 -17.937,10.603 -17.032,9.698 -16.853,9.519 -14.167,9.519 -13.656,9.519 -12.726,10.449 -12.558,10.618 -12.558,10.865 -12.558,16.306 -13.359,17.107 -17.773,17.107 -18.077,16.802 -18.077,11.607 -17.949,11.479
NewNet42 on Signal Layer 1 "Bottom Layer-No Net" (solid, remove dead copper, pour order 77): -8.903,9.571 -5.654,9.571 -4.821,10.429 -4.821,16.751 -6.318,18.292 -7.003,18.292 -9.015,18.292 -9.887,17.395 -9.887,9.974 -9.574,9.653 -9.488,9.564 -8.851,9.564
VOUT1 on Signal Layer 1 "Bottom Layer-No Net" (solid, remove dead copper, pour order 87): -5.121,19.734 -5.121,17.757 -4.357,16.993 -2.684,15.32 -2.684,14.705 -2.684,13.516 cw(c-3.625,13.516) -2.96,12.851 -3.692,12.118 ccw(c-3.645,12.07) -3.712,12.07 -3.712,4.458 -4.123,4.048 -24.833,4.048 -25.023,3.858 -25.023,2.131 -24.816,1.924 -0.986,1.924 -0.635,2.275 -0.635,15.753 -3.187,18.305 -3.602,18.72 -3.602,19.803 -3.747,19.948 -4.907,19.948 -5.121,19.734
SGND on Signal Layer 2 "Bottom Layer-No Net" (solid, remove dead copper, pour order 106): -17.624,24.732 -17.624,22.631 -18.005,22.25 -18.797,22.25 -27.589,22.25 -27.789,22.049 -27.789,21.614 cw(c-28.289,21.614) -28.289,21.114 -30.2,21.114 -30.2,1.784 -1.125,1.784 ccw(c-1.125,2.275) -0.635,2.275 -0.635,16.933 cw(c-0.509,16.933) -0.509,17.059 ccw(c-0.509,17.228) -0.34,17.228 -0.34,17.44 -0.34,21.961 ccw(c-0.67,21.961) -0.67,22.291 -14.68,22.291 ccw(c-14.68,22.165) -14.769,22.254 cw(c-15.191,22.676) -15.191,22.079 -15.349,22.079 -15.51,22.079 cw(c-15.51,22.697) -16.128,22.697 -16.128,24.729 -17.237,24.729

## Keep-outs
Keep-Out Layer:
  lines w0.1: -0.05,22.484 -0.05,3.584 2.45,3.584 2.45,1.784 ; 2.433,1.733 -30.217,1.733 -30.217,20.284 -28.289,20.284 ccw(c-28.289,20.784) -27.789,20.784 -27.789,22.484 -26.819,22.484 -26.819,24.784 -13.819,24.784 -13.819,22.484 ; -13.819,22.484 -0.05,22.484 -13.819,22.484

## Other copper
Top Layer:
  rectangle net EN: -3.353,10.618 -2.804,11.854
  region net VIN: -15.515,24.622 -15.515,22.527 -15.348,22.361 -14.176,22.361 -13.981,22.555 -13.981,24.622
  region net NewNet42: -9.729,11.847 -11.241,13.359 -11.241,14.196 -10.045,15.392 -8.945,15.392 -8.633,15.08 -8.633,12.226 -9.082,11.777 -9.152,11.847
  region net NewNet33: -26.621,24.716 -26.621,22.421 -26.45,22.25 -25.874,22.25 -25.719,22.404 -25.719,24.716
  region net SCL: -25.121,24.716 -25.121,22.421 -24.95,22.25 -24.374,22.25 -24.219,22.404 -24.219,24.716
  region net SDA: -23.621,24.716 -23.621,22.421 -23.45,22.25 -22.874,22.25 -22.719,22.404 -22.719,24.716
  region net SWCLK2: -22.121,24.716 -22.121,22.421 -21.95,22.25 -21.374,22.25 -21.219,22.404 -21.219,24.716
  region net SWDIO2: -20.621,24.716 -20.621,22.421 -20.45,22.25 -19.874,22.25 -19.719,22.404 -19.719,24.716
  region net VOUT1: -19.121,24.716 -19.121,22.421 -18.95,22.25 -18.644,22.25 -18.219,22.675 -18.219,24.716
  region net A+: -28.654,10.742 -26.519,10.742 -26.399,10.622 -26.399,8.055 -26.072,7.728 -26.519,7.281 -26.519,7.278 -26.692,7.105 -26.692,2.358 -26.838,2.212 -29.427,2.212 -29.793,2.578 -29.793,6.184 -28.771,7.206 -28.771,10.625
  region net VOUT1: -26.096,4.601 -23.274,4.601 -22.667,5.207 -22.667,5.435 -21.541,6.561 -20.811,6.561 -20.595,6.345 -20.595,4.839 -20.75,4.684 -21.901,4.684 -22.329,4.256 -22.329,2.326 -22.585,2.069 -26.1,2.069 -26.277,2.246 -26.277,4.42
  region net SRCG_A: -26.075,4.842 -24.266,4.842 -24.095,5.012 -24.095,5.715 -24.183,5.803 -25.99,5.803 -26.195,5.597 -26.195,4.962
  region net SRCG_A: -22.629,6.596 -23.353,5.871 -23.575,5.871 -23.701,5.745 -23.701,5.219 -23.615,5.133 -23.117,5.133 -22.977,5.273 -22.977,5.538 -22.414,6.101 -22.414,6.381
  region net NewNet13: -21.796,2.075 -20.845,2.075 -20.595,2.325 -20.595,4.224 -20.809,4.438 -21.685,4.438 -21.983,4.14 -21.983,2.262
  region net VIN: -16.943,2.053 -11.089,2.053 -10.535,2.607 -10.535,4.272 -10.37,4.436 -1.985,4.436 -1.647,4.099 -1.647,2.261 -1.478,2.092 -0.818,2.092 -0.638,2.272 -0.638,5.859 -1.229,6.449 -9.585,6.449 -9.861,6.173 -16.929,6.173 -17.286,5.817 -17.286,2.395
  region net VOUT1: -3.932,4.045 -2.381,4.045 -2.17,3.835 -2.17,2.195 -2.308,2.057 -4.027,2.057 -4.164,2.193 -4.164,3.814
  region net A-: -25.426,21.107 -23.18,21.107 -22.754,20.681 -22.754,19.529 -23.127,19.155 -25.376,19.155 -26.124,19.904 -26.124,20.409
  region net VOUT1: -20.595,6.965 -20.889,7.259 -21.787,7.259 -22.109,6.936 -22.109,5.747 -22.063,5.701 -20.673,5.701 -20.595,5.779
  pour cut-out: -19.132,18.632 -19.132,18.959 -18.555,18.959 -18.468,18.871 -18.468,18.38 -18.77,18.078 -18.77,17.646 -18.999,17.416 -19.448,17.416 -19.682,17.65 -19.682,18.082
  pour cut-out: -15.809,19.211 -16.147,19.211 -16.147,19.86 -15.452,19.86 -15.143,19.552 -14.864,19.552 -14.605,19.293 -14.605,18.844 -14.839,18.61 -15.209,18.61
  pour cut-out: -28.975,9.354 -28.583,8.962 -26.735,8.962 -26.195,9.502 -26.195,14.155 -26.266,14.226 -26.581,13.91 -28.975,13.91
  region net VFB1: -4.903,4.099 -4.729,3.924 -4.729,2.221 -4.875,2.075 -5.443,2.075 -5.56,2.191 -5.56,2.953 -5.966,3.359 -8.411,3.359 -8.576,3.524 -8.576,4.002 -8.479,4.099
  region net NewNet42: -9.361,12.464 -8.911,12.464 -8.744,12.297 -8.744,10.82 -8.386,10.462 -7.976,10.462 cw(c-7.976,10.153) -7.667,10.153 -7.667,10.141 cw(c-7.987,10.141) -7.987,9.821 -8.851,9.821 cw(c-8.851,10.661) -9.691,10.661 -9.691,12.133 cw(c-9.364,12.133) -9.364,12.459
  region net VOUT1: -3.758,12.808 cw(c-3.758,13.637) -4.588,13.637 -4.588,17.58 -5.121,18.113 -5.121,19.734 -4.907,19.948 -3.747,19.948 -3.457,19.658 -3.457,18.575 -2.917,18.035 -2.917,13.548 cw(c-3.655,13.548) -3.655,12.811
Signal Layer 1:
  rectangle net VIN: -15.404,22.646 -14.148,24.368
  rectangle net SGND: -16.525,21.962 -14.68,22.301
  region net VOUT1: -18.219,24.716 -18.219,22.504 -17.291,21.576 -11.942,21.576 -11.479,21.112 -3.948,21.112 -3.457,20.621 -3.457,18.228 -3.772,17.913 -4.729,17.913 -5.121,18.305 -5.121,19.057 -6.233,20.169 -11.877,20.169 -12.638,20.929 -17.629,20.929 -19.121,22.421 -19.121,24.716
  region net VOUT1: -19.121,24.716 -19.121,22.421 -18.95,22.25 -18.644,22.25 -18.219,22.675 -18.219,24.716
  region net SWDIO2: -20.621,24.716 -20.621,22.421 -20.45,22.25 -19.719,22.25 -19.719,24.716
  region net SWCLK2: -22.121,24.716 -22.121,22.421 -21.95,22.25 -21.374,22.25 -21.219,22.404 -21.219,24.716
  region net SDA: -23.621,24.716 -23.621,22.421 -23.45,22.25 -22.874,22.25 -22.719,22.404 -22.719,24.716
  region net NewNet33: -26.621,24.716 -26.621,22.421 -26.45,22.25 -25.874,22.25 -25.719,22.404 -25.719,24.716
  region net SCL: -25.121,24.716 -25.121,22.421 -24.95,22.25 -24.374,22.25 -24.219,22.404 -24.219,24.716
  pour cut-out: -25.117,18.756 -16.058,18.756 -15.262,19.552 -14.864,19.552 -14.605,19.293 -14.605,18.861 -14.834,18.631 -15.059,18.631 -15.536,18.154 -24.366,18.154 -24.759,17.761 -25.208,17.761 -25.442,17.995 -25.442,18.431
  pour cut-out: -23.19,18.034 -23.19,17.603 -23.073,17.486 -23.073,16.236 -22.596,15.759 -22.593,15.759 -22.593,15.544 -22.358,15.309 -21.91,15.309 -21.68,15.539 -21.68,15.971 -21.939,16.23 -22.138,16.23 -22.418,16.509 -22.418,17.459 -22.278,17.598 -22.278,18.031 -22.537,18.289 -22.935,18.289
  region net VIN: -15.331,5.952 -12.792,5.952 -12.678,5.838 -12.678,5.018 -12.809,4.887 -15.411,4.887 -15.528,5.004 -15.528,5.838 -15.441,5.926
Signal Layer 2:
  rectangle net SGND: -16.508,21.748 -14.68,22.301
  rectangle net VIN: -15.388,22.639 -14.189,24.363
  region net VOUT1: -24.736,3.941 -23.41,3.941 -23.288,3.819 -23.288,2.297 -23.401,2.183 -24.799,2.183 -24.956,2.34 -24.956,3.803 -24.83,3.929
Bottom Layer:
  rectangle net NewNet36: -26.05,15.98 -25.716,17.009
  rectangle net CPA: -24.123,16.817 -23.203,17.378
  rectangle net NewNet25: -22.165,16.845 -21.601,17.99
  rectangle net NewNet18: -20.794,5.811 -19.529,6.411
  rectangle net NewNet18: -19.589,6.204 -19.211,7.422
  region net VOUT1: -19.121,24.716 -19.121,22.421 -18.95,22.25 -18.644,22.25 -18.219,22.675 -18.219,24.716
  region net SWDIO2: -20.621,24.716 -20.621,22.421 -20.45,22.25 -19.874,22.25 -19.719,22.404 -19.719,24.716
  region net SWCLK2: -22.121,24.716 -22.121,22.421 -21.95,22.25 -21.374,22.25 -21.219,22.404 -21.219,24.716
  region net SDA: -23.621,24.716 -23.621,22.421 -23.45,22.25 -22.874,22.25 -22.719,22.404 -22.719,24.716
  region net SCL: -25.121,24.716 -25.121,22.421 -24.95,22.25 -24.374,22.25 -24.219,22.404 -24.219,24.716
  region net NewNet33: -26.622,24.727 -26.622,21.241 -26.567,21.187 -26.56,21.187 -25.717,22.029 -25.717,24.727
  region net VOUT1: -22.604,5.929 -21.688,5.929 -21.474,6.143 -21.474,7.461 -21.583,7.569 -21.583,7.463 -22.109,6.936 -22.512,6.936 -22.718,6.731 -22.718,6.044
  pour cut-out: -19.534,20.537 -20.09,20.537 -20.512,20.115 -20.512,19.392 -21.062,18.841 -23.612,18.841 -23.787,18.667 -23.787,17.716 -23.592,17.521 -23.081,17.521 -22.944,17.384 -22.436,17.384 -22.275,17.545 -22.275,18.086 -22.134,18.227 -20.756,18.227 -19.848,19.136 -19.848,19.799 -19.758,19.888 -19.503,19.888 -19.4,19.991 -19.4,20.461 -19.467,20.528
  pour cut-out: -24.492,13.19 -24.138,13.19 -24.009,13.319 -24.009,15.695 -24.313,16 -24.313,16.472 -24.62,16.779 -24.62,17.757 -24.515,17.862 -24.515,18.478 -24.726,18.689 -25.184,18.689 -25.441,18.433 -25.441,18.04 -25.306,17.906 -25.306,16.552 -25.506,16.352 -25.506,15.752 -25.249,15.494 -24.816,15.494 -24.607,15.285 -24.607,13.305
  pour cut-out: -22.868,13.183 -22.133,13.183 -22.004,13.312 -22.004,15.243 -21.649,15.599 -21.649,15.899 -21.51,16.038 -21.242,16.038 -20.833,16.447 -20.176,16.447 -19.237,17.386 -19.237,17.409 -19.025,17.409 -18.77,17.664 -18.77,18.078 -19.029,18.337 -19.443,18.337 -19.706,18.074 -19.706,17.837 -20.075,17.468 -21.214,17.468 -21.325,17.357 -21.325,16.837 -21.492,16.669 -22.488,16.669 -23.006,16.152 -23.006,13.321
  region net NewNet32: -28.827,14.549 -27.945,14.549 -27.836,14.44 -27.836,11.618 -27.947,11.506 -28.686,11.506 -28.95,11.771 -28.95,14.426
  region net NewNet34: -27.187,10.486 -25.008,10.486 -24.928,10.405 -24.928,9.957 -25.002,9.883 -26.156,9.883 -26.536,9.502 -27.236,9.502 -27.341,9.608 -27.341,10.331
  region net VOUT1: -3.866,12.815 cw(c-3.866,13.54) -4.591,13.54 -4.591,17.583 -5.121,18.113 -5.121,19.306 -4.633,19.795 -3.668,19.795 -3.355,19.481 -3.355,18.473 -1.856,16.974 -1.856,12.951 -2.684,12.951 -2.684,16.46 -3.466,17.242 -3.466,16.737 -2.908,16.178 -2.908,13.578 cw(c-3.68,13.578) -3.68,12.806 -3.706,12.806
  region net SW-SR: -1.285,13.957 -0.522,13.957 cw(c-0.522,13.742) -0.306,13.742 -0.306,11.608 cw(c-0.863,11.608) -0.863,11.051 -0.949,11.051 cw(c-0.949,12.008) -1.625,11.332 -1.628,11.334 cw(c-1.124,11.838) -1.836,11.838 -1.836,11.861 cw(c-1.066,11.861) -1.611,12.406 ccw(c-1.796,12.591) -1.534,12.591 -1.534,13.78 cw(c-1.361,13.78) -1.361,13.952
Multi-Layer:
  pour cut-out: -19.427,18.337 -19.029,18.337 -18.77,18.078 -18.77,17.646 -18.999,17.416 -19.448,17.416 -19.682,17.65 -19.682,18.082
  pour cut-out: -22.338,16.23 -21.939,16.23 -21.68,15.971 -21.68,15.539 -21.91,15.309 -22.358,15.309 -22.593,15.544 -22.593,15.975
  pour cut-out: -22.935,18.289 -22.537,18.289 -22.278,18.031 -22.278,17.598 -22.507,17.369 -22.956,17.369 -23.19,17.603 -23.19,18.034
  pour cut-out: -25.187,18.681 -24.789,18.681 -24.53,18.423 -24.53,17.99 -24.759,17.761 -25.208,17.761 -25.442,17.995 -25.442,18.426
  pour cut-out: -15.262,19.552 -14.864,19.552 -14.605,19.293 -14.605,18.861 -14.834,18.631 -15.283,18.631 -15.517,18.865 -15.517,19.297

## Silkscreen, mask and mechanical layers (free items; w line width, h text height)
Top Overlay:
  rectangle: -29.453,11.911 -28.531,16.154
  rectangle: -29.453,14.839 -26.102,16.154
  lines w0.1: -26.563,6.785 cw(c-26.565,7.395) -27.175,7.396 -27.175,18.33 -27.187,19.385 ; -26.563,6.796 -22.063,6.796 ccw(c-22.051,7.396) -21.452,7.396 -21.463,19.396 ; -24.325,13.396 -24.325,19.996 ; -22.063,19.996 -26.563,19.996 ccw(c-26.562,19.371) -27.187,19.385 ; -21.463,19.385 -27.187,19.385 ; -16.876,10.16 ccw(c-15.626,10.159) -15.627,8.909 -14.917,8.909 ccw(c-14.916,10.159) -13.666,10.158 -13.662,16.598 ccw(c-14.912,16.599) -14.912,17.849 -15.622,17.849 ccw(c-15.622,16.599) -16.872,16.6 -16.876,10.16 ; -8.876,10.168 ccw(c-7.626,10.167) -7.627,8.917 -6.917,8.917 ccw(c-6.916,10.167) -5.666,10.166 -5.662,16.606 ccw(c-6.912,16.607) -6.911,17.857 -7.621,17.857 ccw(c-7.622,16.607) -8.872,16.608 -8.876,10.168
  text "NMOS" at -11.054,6.472 h0.5 r180
  text "NMOS" at -14.682,6.449 h0.5 r180
  text "PMOS" at -20.65,6.198 h0.5 r270
  text "PMOS" at -26.68,4.905 h0.5 r270